# Altium PCB PCB1.PcbDoc (part 1 of 4)
Units mm, origin at the board's own origin, x right, y up, seen from the top; angles counter-clockwise.
Board outline 134.12 x 116.9 mm, 4 copper layers (Top Layer, Layer 1, Layer 2, Bottom Layer), stack 1.312 mm thick; 317 components, 155 nets, 807 pads, 898 vias.
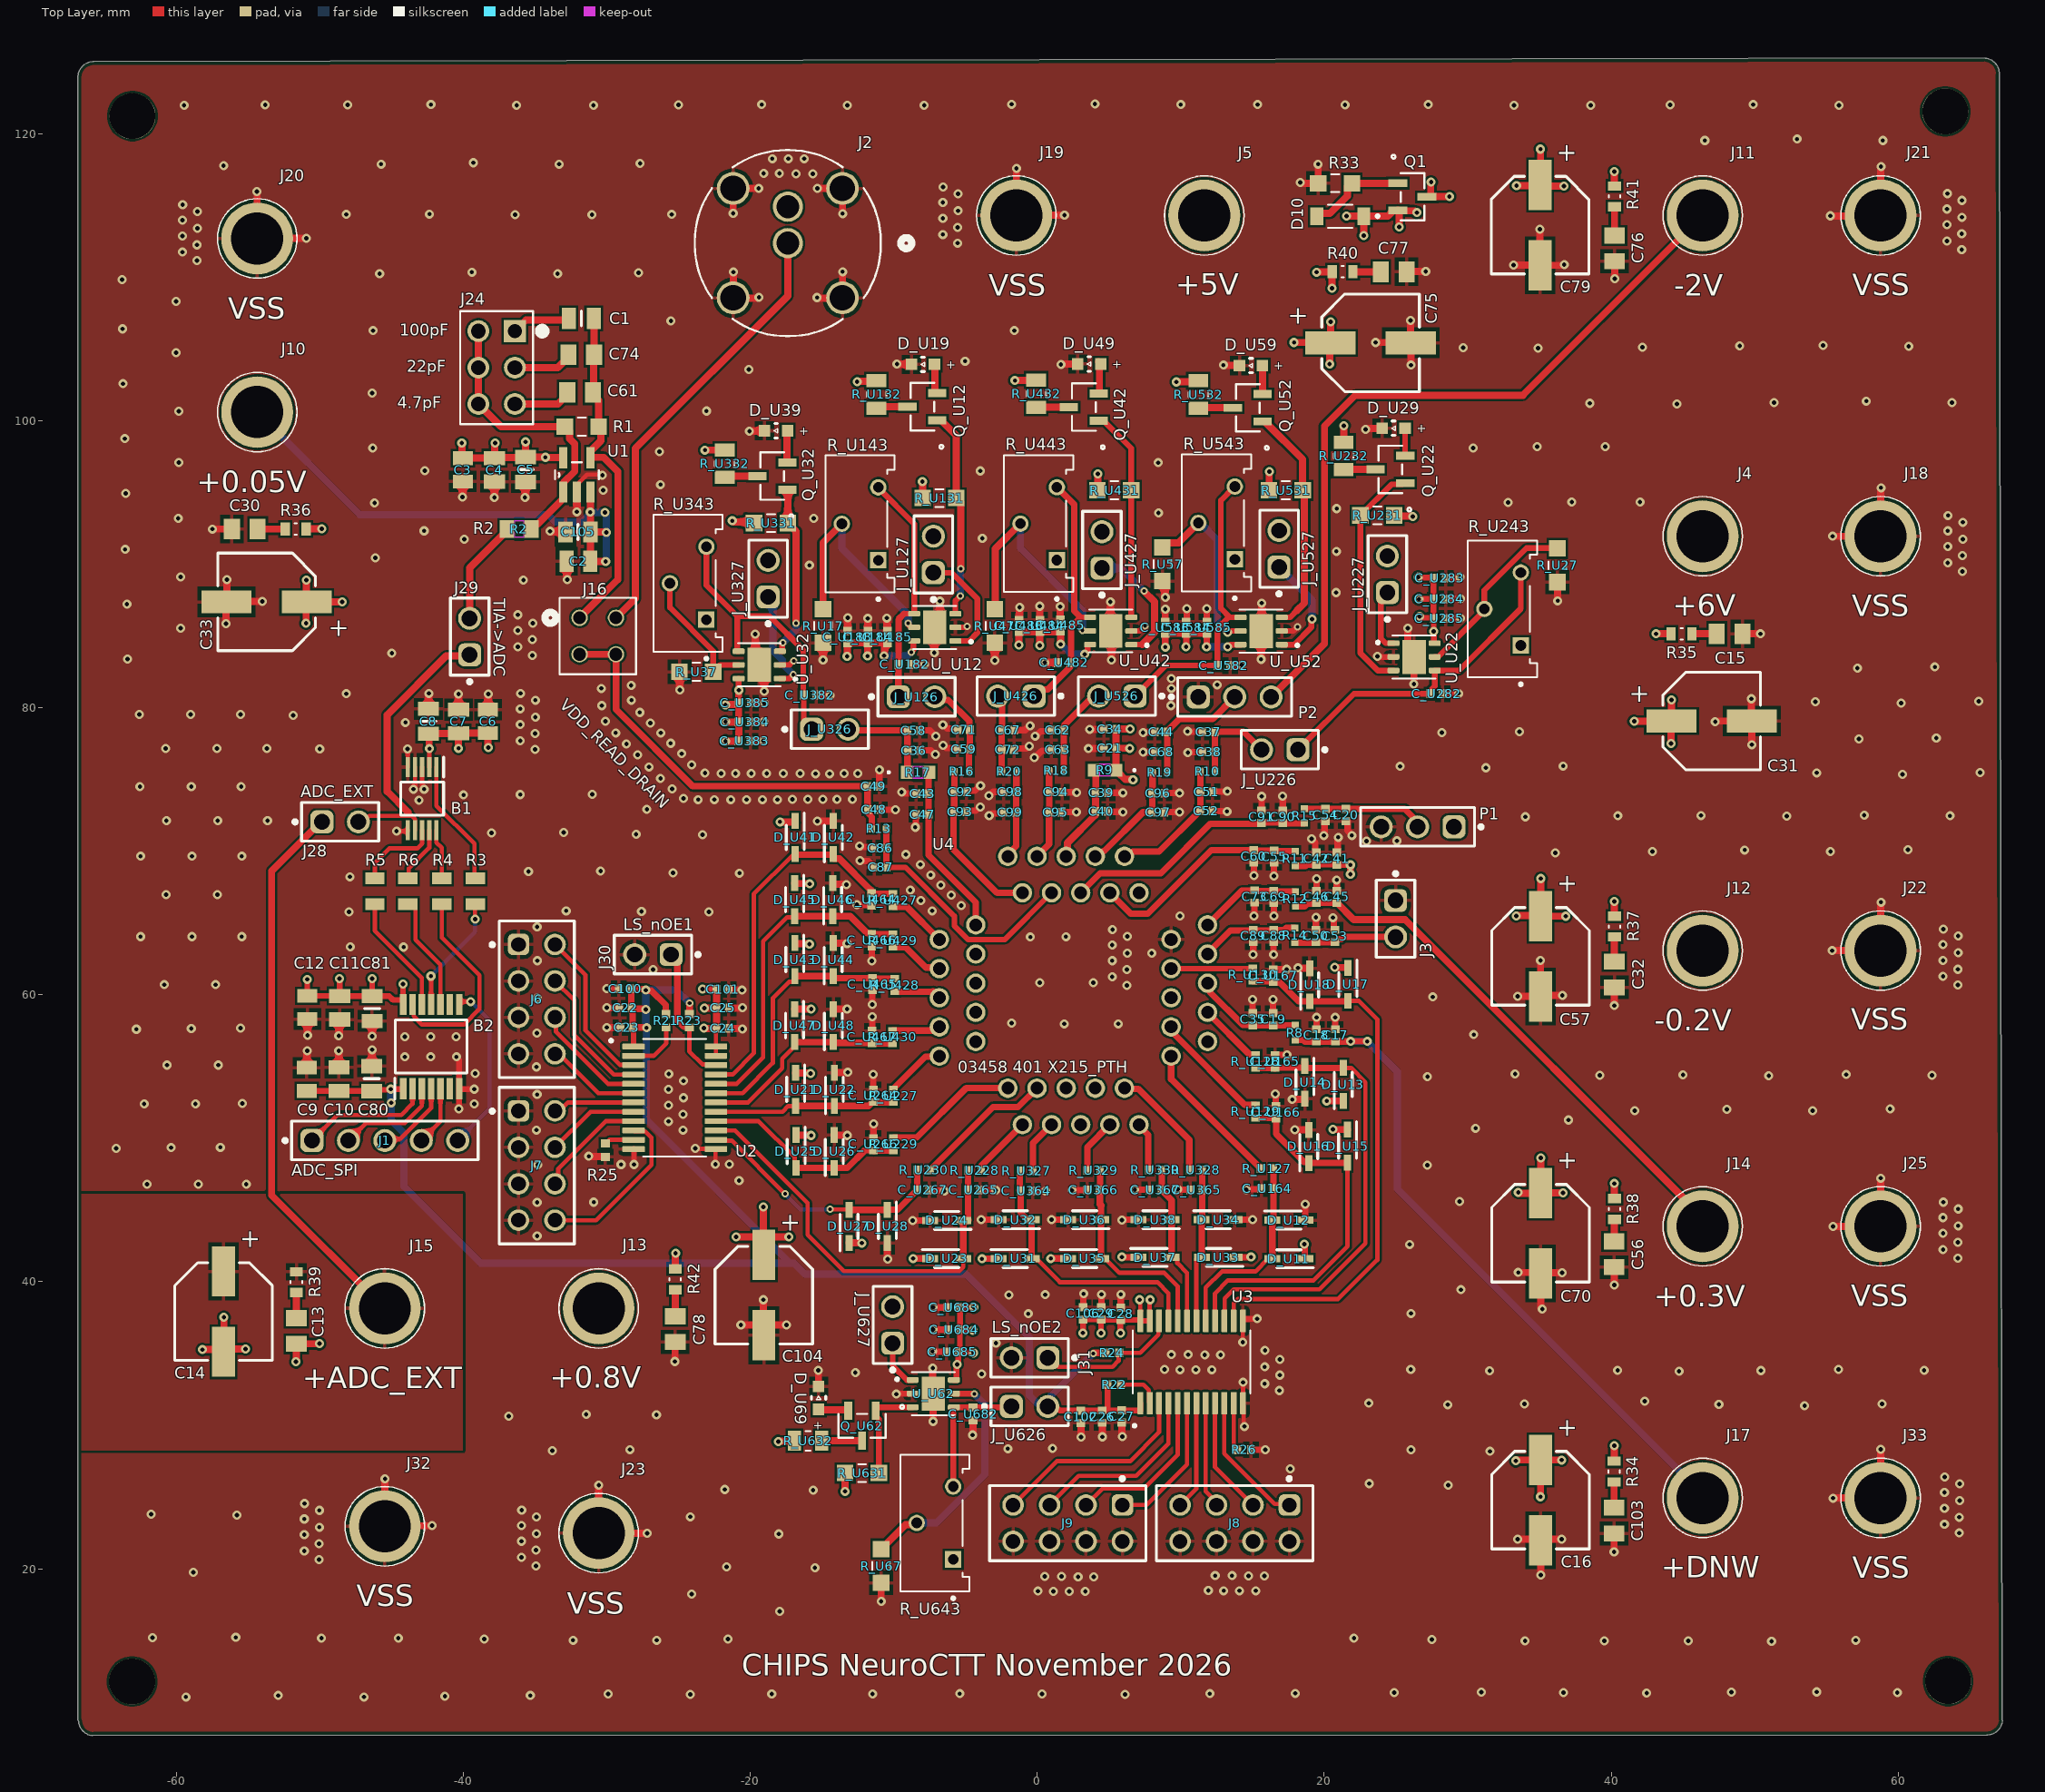
[diagram p0: Top Layer view]
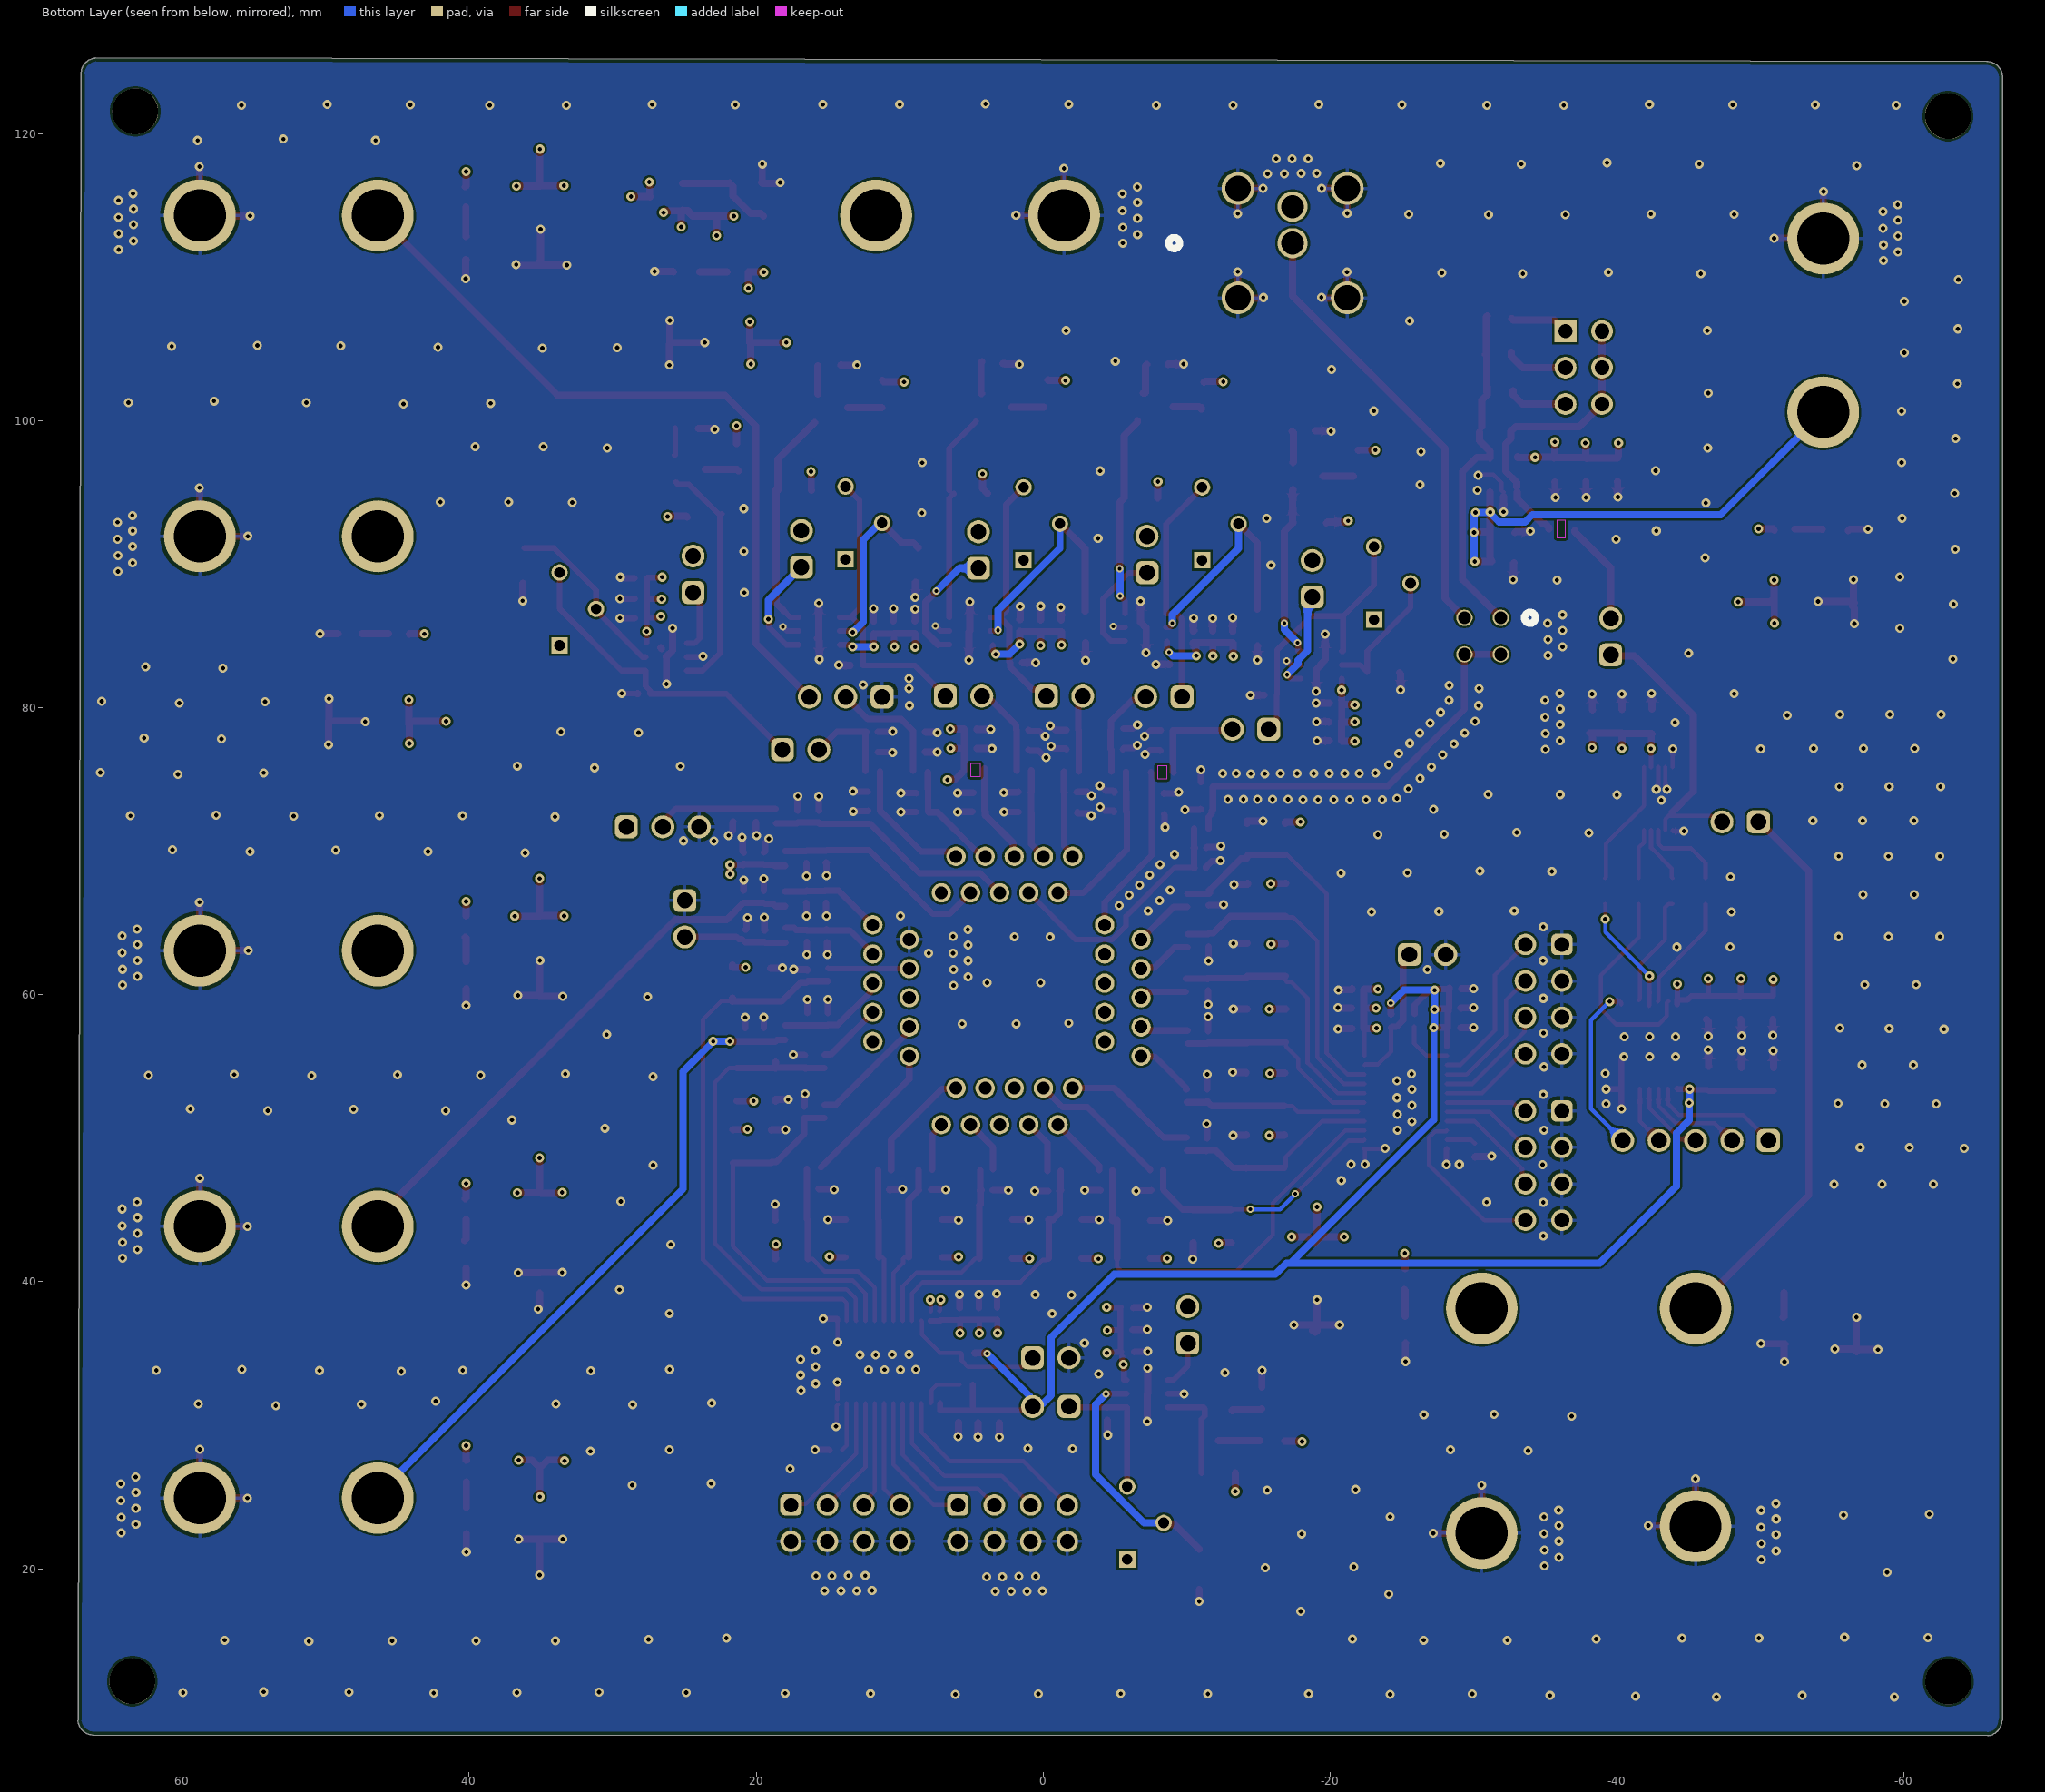
[diagram p1: Bottom Layer view, seen from below]
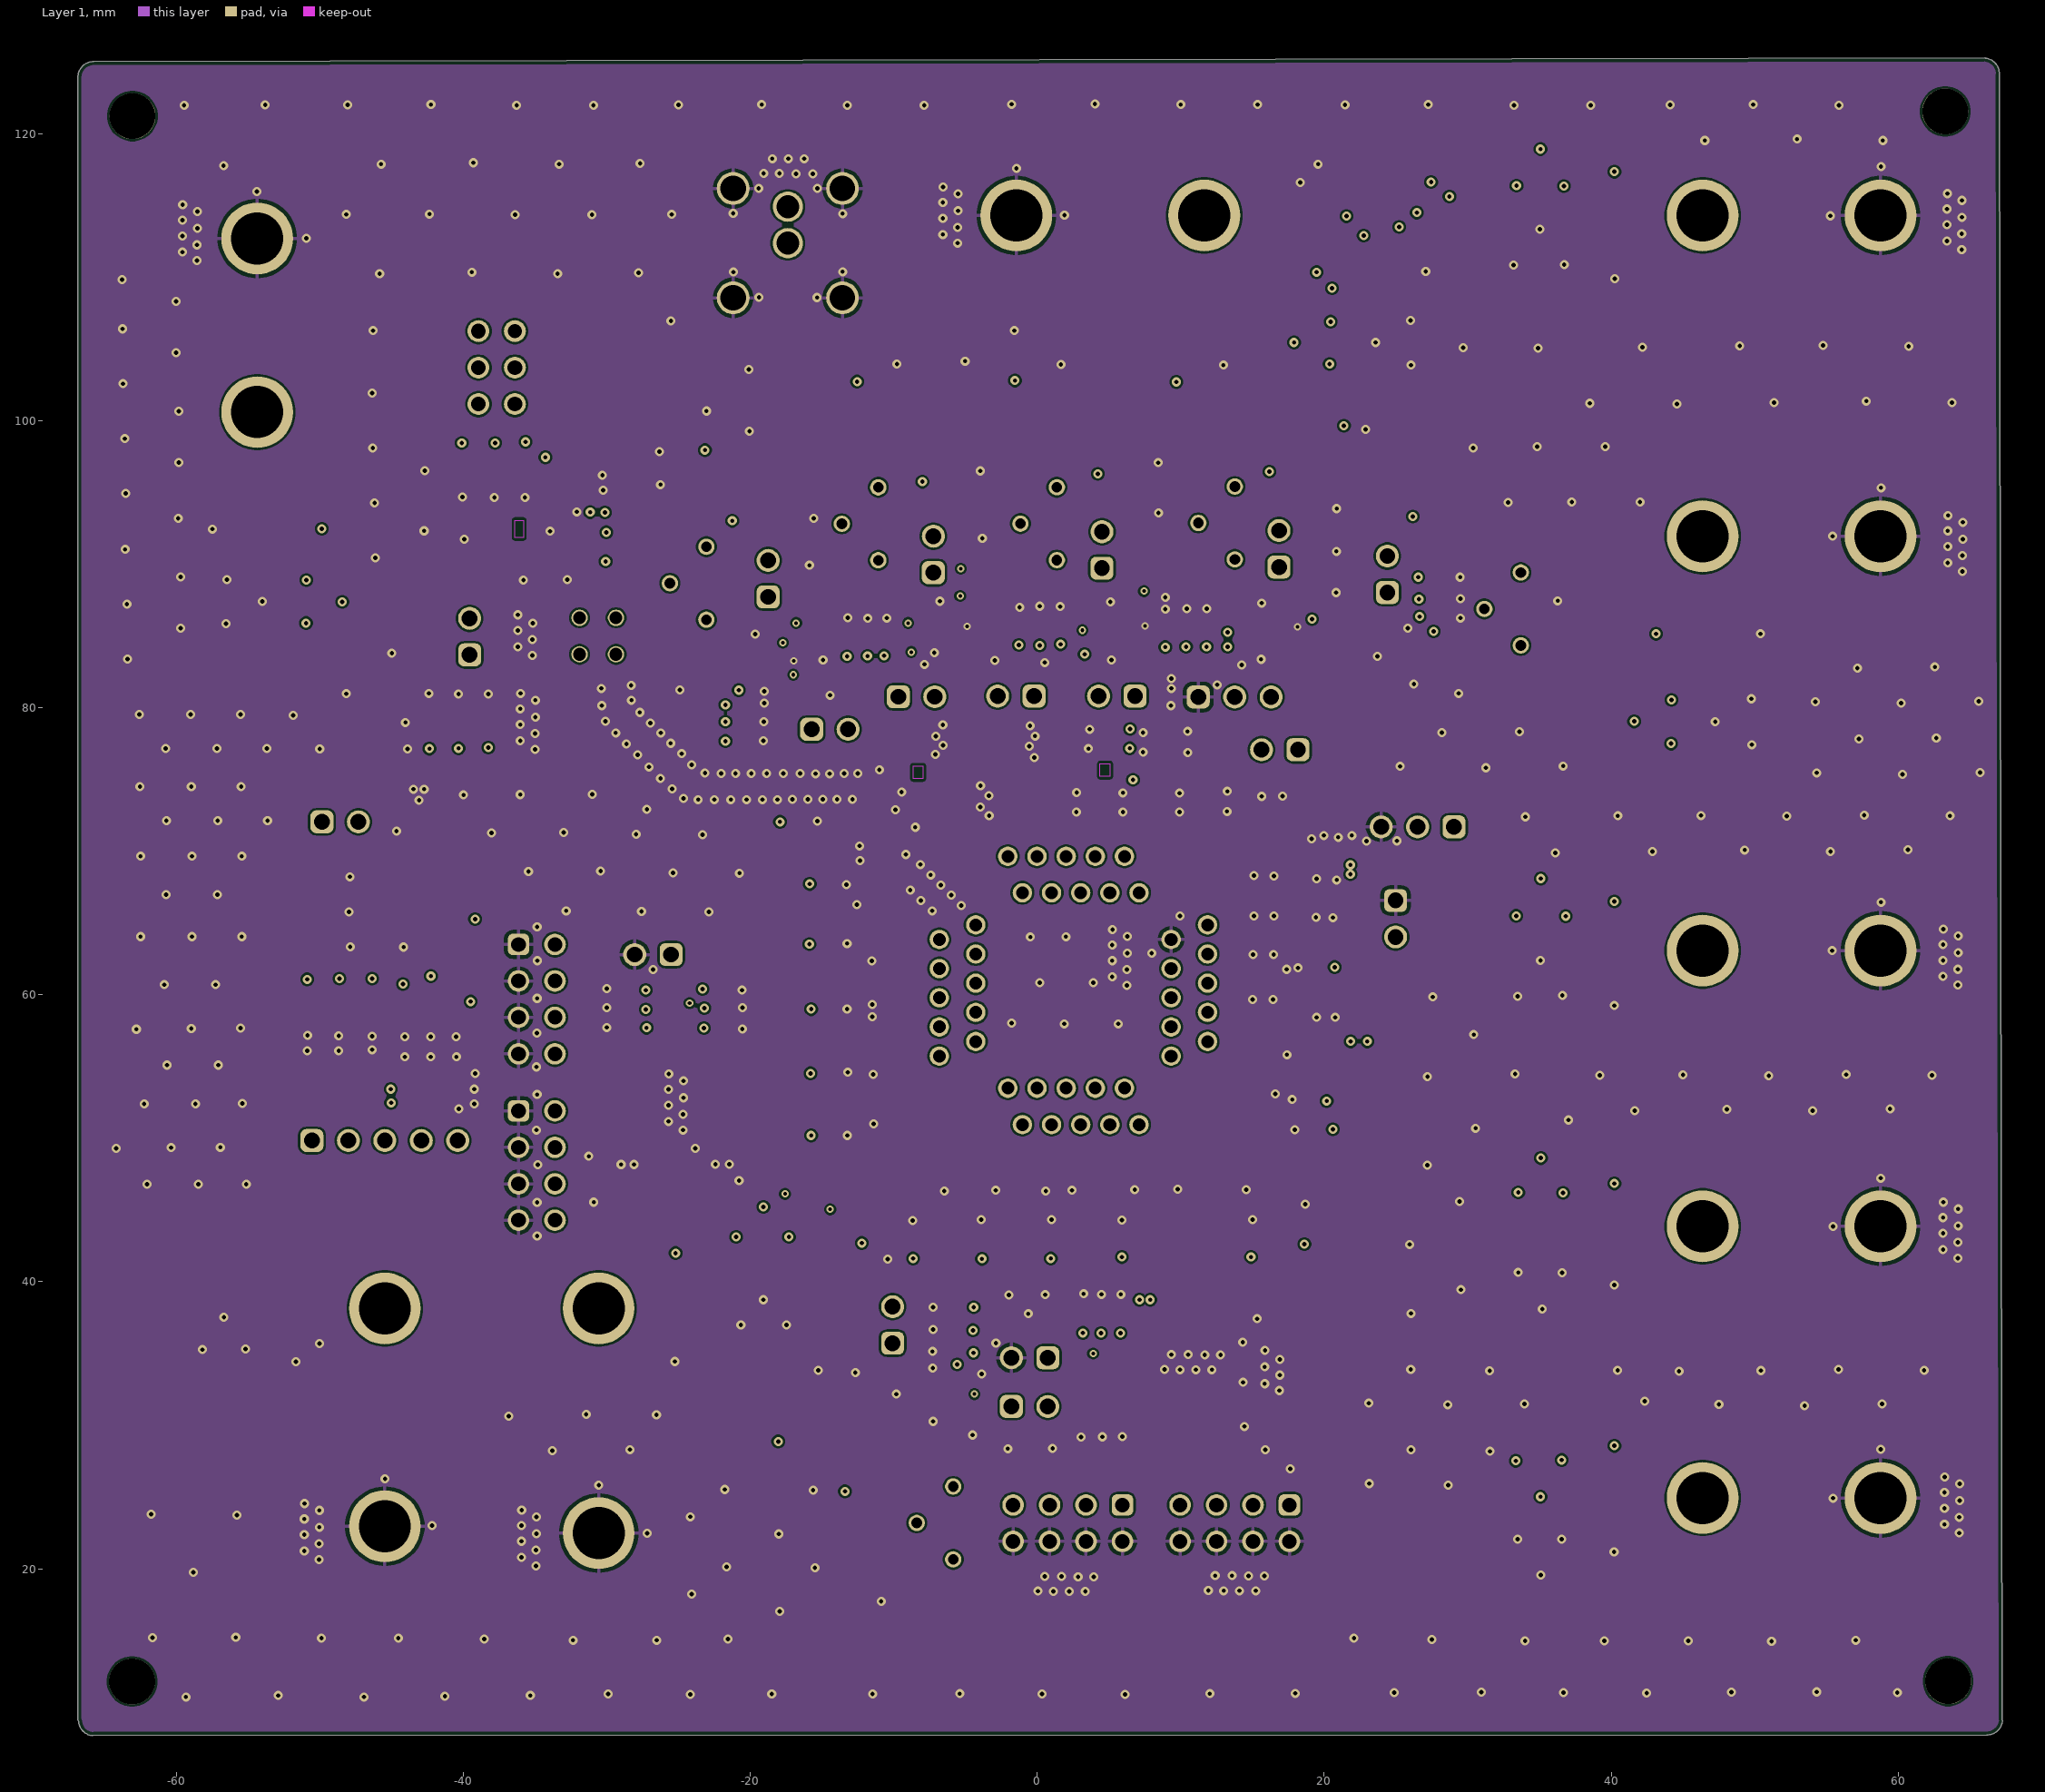
[diagram p2: Layer 1]
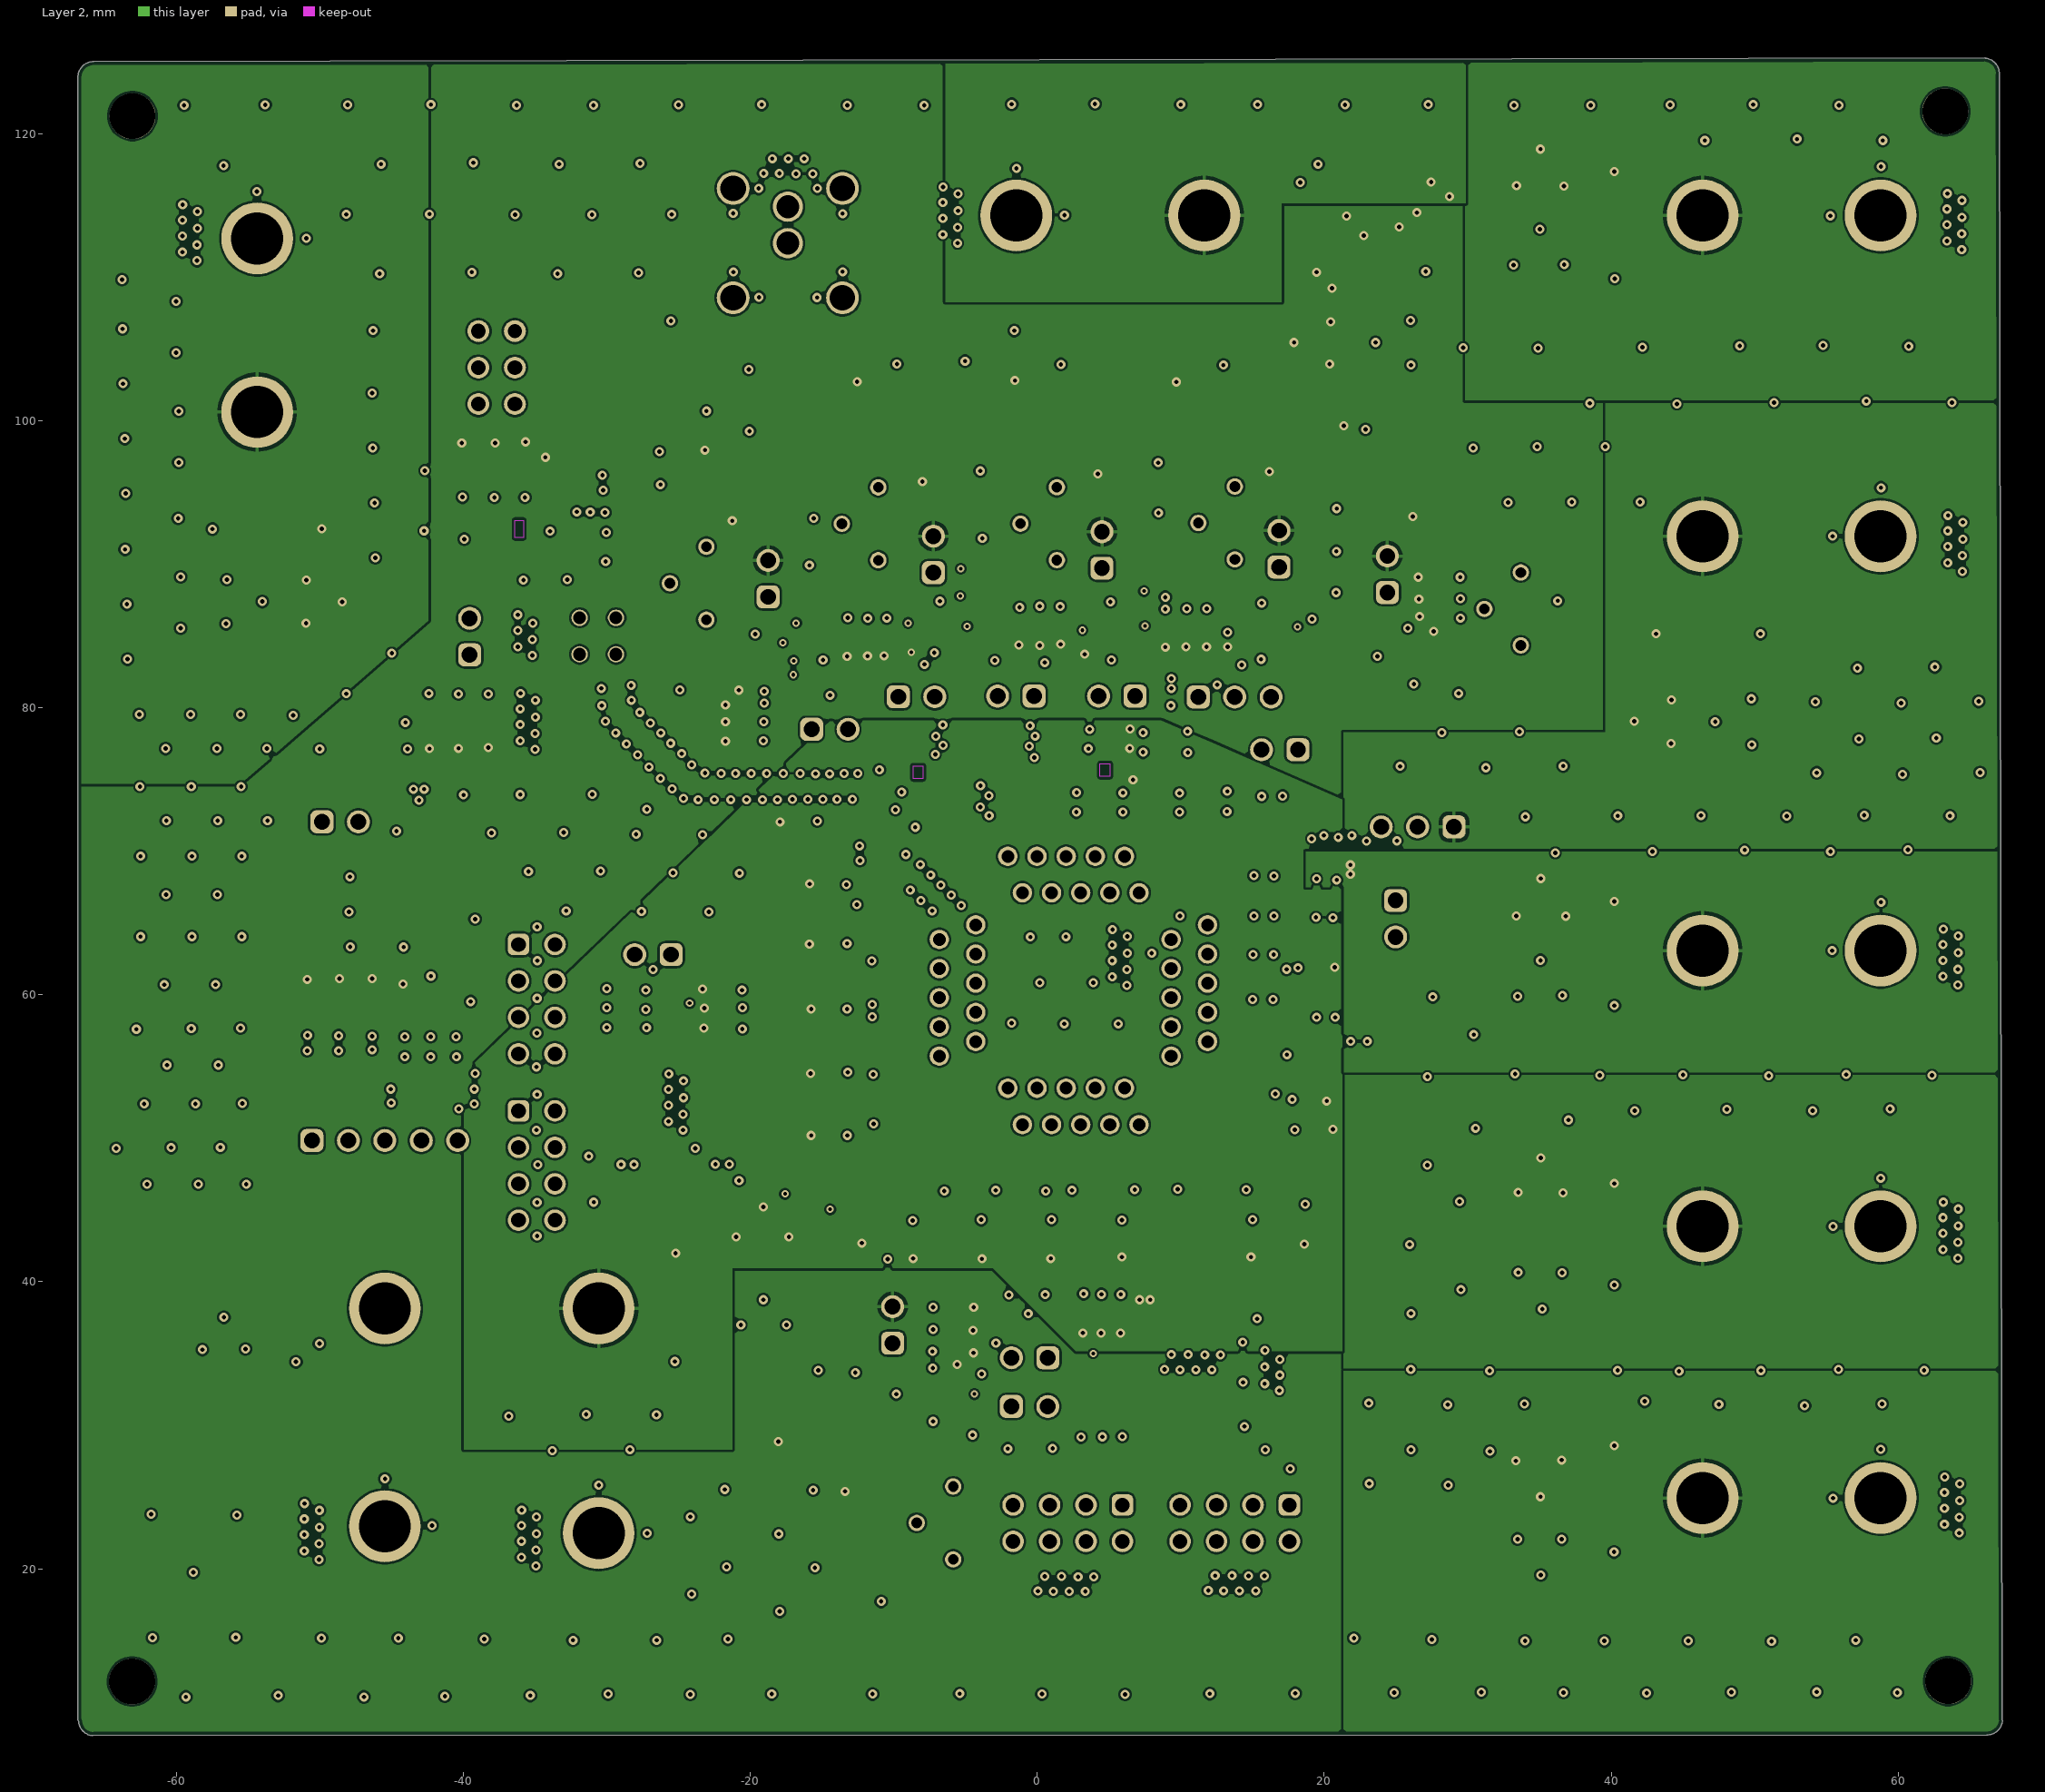
[diagram p3: Layer 2]

## Layer stack, top to bottom
Top Solder: solder mask 0.0175, Solder Resist, Dk 3.3
Top Layer: signal copper 0.035
Dielectric 1: prepreg 0.0711, PP-006, Dk 4.74
Layer 1: signal copper 0.035
Dielectric1: core 1.03, FR-4, Dk 4.6
Layer 2: signal copper 0.035
Dielectric 2: prepreg 0.0711, PP-006, Dk 4.74
Bottom Layer: signal copper 0.035
Bottom Solder: solder mask 0.0175, Solder Resist, Dk 3.3

## Board outline
-65.804,8.375 cw(c-65.725,9.461) -66.813,9.426 -66.85,9.475 -66.85,124 -66.841,124.029 cw(c-65.756,123.936) -65.75,125.025 -65.74,125.024 66.05,125.275 66.083,125.263 cw(c65.961,124.181) 67.05,124.181 67.039,124.143 67.254,9.472 67.267,9.435 cw(c66.181,9.514) 66.175,8.425 66.162,8.426

## Design rules (kind name [scope] priority, off if disabled: settings)
BoardOutlineClearance [All] p1: gap=0.254 ignorepadtopadclearanceinfootprint=FALSE except(0: Arc-SplitContinuation Track-SplitContinuation SMDPad-SplitContinuation THPad-SplitContinuation Via-SplitContinuation Fill-SplitContinuation Poly-SplitContinuation Region-SplitContinuation Text-SplitContinuation)
Clearance "Dense area exception" [(IsComponent AND IsComponentBody) vs (IsComponent AND IsComponentBody)] p1: gap=0 ignorepadtopadclearanceinfootprint=FALSE
Clearance Clearance_1 [All] p2: gap=0.15 ignorepadtopadclearanceinfootprint=TRUE except(0: Arc-Text Track-Text SMDPad-Text THPad-Text Via-Via Via-Text Fill-Text Poly-Text Region-Text Text-Text Text-Hole; 0.2: Fill-Fill Fill-Poly Fill-Region Poly-Poly Poly-Region Region-Region)
DiffPairsRouting [All] p1: maxlimit=0.254 minlimit=0.254 mostfreqgap=0.254 toplayer_minwidth=0.254 toplayer_maxwidth=0.254 toplayer_prefwidth=0.254 midlayer1_minwidth=0.254 midlayer1_maxwidth=0.254 midlayer1_prefwidth=0.254 midlayer2_minwidth=0.254 midlayer2_maxwidth=0.254 midlayer2_prefwidth=0.254 bottomlayer_minwidth=0.254 bottomlayer_maxwidth=0.254 bottomlayer_prefwidth=0.254 maxuncoupledlength=12.7
HoleSize [All] p1: absolutevalues=TRUE maxlimit=7.62 minlimit=0.254 maxpercent=80.000 minpercent=20.000
MinimumAnnularRing [All] p1: minimumring=0.254
PasteMaskExpansion [All] p1: expansion=0.2
PlaneClearance [All] p1: clearance=0.381
PlaneConnect [All] p1: pad.planeconnectstyle=Relief pad.reliefexpansion=0.508 pad.reliefentries=4 pad.reliefconductorwidth=0.254 pad.reliefairgap=0.254 via.planeconnectstyle=Direct via.reliefexpansion=0.508 via.reliefentries=4 via.reliefconductorwidth=0.254 via.reliefairgap=0.254
PolygonConnect [All] p1: thpad.connectstyle=Relief thpad.reliefconductorwidth=0.254 thpad.reliefentries=4 thpad.polygonreliefangle="90 Angle" thpad.airgapwidth=0.254 smdpad.connectstyle=Relief smdpad.reliefconductorwidth=0.254 smdpad.reliefentries=4 smdpad.polygonreliefangle="90 Angle" smdpad.airgapwidth=0.254 via.connectstyle=Direct via.reliefconductorwidth=0.254 via.reliefentries=4 via.polygonreliefangle="90 Angle" via.airgapwidth=0.254
RoutingVias [All] p1: holewidth=0.305 width=0.635 viastyle="Through Hole" minholewidth=0.254 minwidth=0.508 maxholewidth=0.305 maxwidth=0.635
SMDNeckDown [All] p1: percent=100.000
SilkToSolderMaskClearance SilkscreenOverComponentPads [IsPad] p1: minsilkscreentomaskgap=0.254 clearancetoexposedcopper=TRUE
SolderMaskExpansion [All] p1: expansion=0.05 istentingtop=FALSE
SupplyNets "Schematic Supply Nets_8" [InNet('+6V')] p1: voltage=0.000
SupplyNets "Schematic Supply Nets_2" [InNet('VDD_5V_U1')] p2: voltage=0.000
SupplyNets "Schematic Supply Nets_7" [InNet('+0.3V')] p3: voltage=0.000
SupplyNets "Schematic Supply Nets_5" [InNet('-2V')] p4: voltage=0.000
SupplyNets "Schematic Supply Nets_4" [InNet('+0.8V')] p5: voltage=0.000
SupplyNets "Schematic Supply Nets_3" [InNet('-0.2V')] p6: voltage=0.000
SupplyNets "Schematic Supply Nets_1" [InNet('CHIPS_VSS')] p7: voltage=0.000
SupplyNets "Schematic Supply Nets" [InNet('+0.05V')] p8: voltage=0.000
Width [All] p1: maxlimit=0.5 minlimit=0.102 preferedwidth=0.3 midlayer1_minwidth=0.254 midlayer1_prefwidth=0.254 midlayer2_minwidth=0.254 midlayer2_prefwidth=0.254 minimp=50.000000 maximp=50.000000 favimp=50.000000
24 further rules are at their usual default settings.

## Classes and differential pairs
component class U_LDO5: C_U582 C_U583 C_U584 C_U585 D_U59 J_U526 J_U527 Q_U52 R_U57 R_U531 R_U532 R_U543 U_U52
component class U_LDO1: C_U182 C_U183 C_U184 C_U185 D_U19 J_U126 J_U127 Q_U12 R_U17 R_U131 R_U132 R_U143 U_U12
component class U_LDO6: C_U682 C_U683 C_U684 C_U685 D_U69 J_U626 J_U627 Q_U62 R_U67 R_U631 R_U632 R_U643 U_U62
channel class LDO: U_LDO1 U_LDO2 U_LDO3 U_LDO4 U_LDO5 U_LDO6
channel class ESD-0.8V: U_ESD-0.8V1 U_ESD-0.8V2 U_ESD-0.8V3 U_ESD-0.8V4
component class U_TIA: C1 C2 C3 C4 C5 C61 C74 C105 J24 R1 R2 U4
component class U_LDO4: C_U482 C_U483 C_U484 C_U485 D_U49 J_U426 J_U427 Q_U42 R7_U_LDO4 R_U47 R_U431 R_U432 R_U443 U_U42 U_U_LDO4
component class U_LDO3: C_U382 C_U383 C_U384 C_U385 D_U39 J_U326 J_U327 Q_U32 R7_U_LDO3 R_U37 R_U331 R_U332 R_U343 U_U32 U_U_LDO3
component class U_LDO2: C_U282 C_U283 C_U284 C_U285 D_U29 J_U226 J_U227 Q_U22 R7_U_LDO2 R_U27 R_U231 R_U232 R_U243 U_U22 U_U_LDO2
component class U_ESD-0.8V4: C_U464 C_U465 C_U466 C_U467 D_U41 D_U42 D_U43 D_U44 D_U45 D_U46 D_U47 D_U48 R_U427 R_U428 R_U429 R_U430
component class U_ESD-0.8V3: C_U364 C_U365 C_U366 C_U367 D_U31 D_U32 D_U33 D_U34 D_U35 D_U36 D_U37 D_U38 R_U327 R_U328 R_U329 R_U330
component class U_ESD-0.8V2: C_U264 C_U265 C_U266 C_U267 D_U21 D_U22 D_U23 D_U24 D_U25 D_U26 D_U27 D_U28 R_U227 R_U228 R_U229 R_U230
component class U_ESD-0.8V1: C_U164 C_U165 C_U166 C_U167 D_U11 D_U12 D_U13 D_U14 D_U15 D_U16 D_U17 D_U18 R_U127 R_U128 R_U129 R_U130
component class U_Connectors: C13 C14 C15 C16 C30 C31 C32 C33 C56 C57 C70 C75 C76 C77 C78 C79 C103 C104 D10 J1 J2 J3 J4 J5 J6 J7 J8 J9 J10 J11 J12 J13 J14 J15 J16 J17 J18 J19 J20 J21 J22 J23 J25 J28 J29 J30 J31 J32 J33 P1 P2 Q1 R33 R34 R35 R36 R37 R38 R39 R40 R41 R42
component class U_Chip: * C17 C18 C19 C20 C21 C22 C23 C24 C25 C26 C27 C28 C29 C34 C35 C36 C37 C38 C39 C40 C41 C42 C43 C44 C45 C46 C47 C48 C49 C50 C51 C52 C53 C54 C55 C58 C59 C60 C62 C63 C67 C68 C69 C71 C72 C73 C86 C87 C88 C89 C90 C91 C92 C93 C94 C95 C96 C97 C98 C99 C100 C101 C102 C106 R8 R9 R10 R11 R12 R13 R14 R15 R16 R17 R18 R19 R20 R21 R22 R23 R24 R25 R26 U2 U3 U4
component class U_ADC: B1 B2 C6 C7 C8 C9 C10 C11 C12 C80 C81 R3 R4 R5 R6

## Components (designator, comment, footprint, x,y, rotation, side; value= is the part's Value field where it differs from the comment)
B1 "ADC124S101CIMM_NOPB" SOP50P490X110-10N -42.863,73.665 r270 top
B2 "TXU0304QPWRQ1" SOP65P640X120-14N -42.233,56.388 r90 top
C1 "0805CA101KAT2A" CAPC2112X94N -31.775,107.125 r180 top
C2 "VJ0805Y104KXAMR" CAPC2012X145N -31.975,90.2 r0 top
C3 "VJ0805Y105KXQTW1BC" CAPC2012X135N -40.025,96.575 r90 top
C4 "VJ0805Y104KXAMR" CAPC2012X145N -37.825,96.575 r90 top
C5 "0805CA101KAT2A" CAPC2112X94N -35.65,96.6 r90 top
C6 "VJ0805Y105KXQTW1BC" CAPC2012X135N -38.275,79.05 r270 top
C7 "VJ0805Y104KXAMR" CAPC2012X145N -40.325,79.05 r270 top
C8 "0805CA101KAT2A" CAPC2112X94N -42.425,79.05 r270 top
C9 "VJ0805Y105KXQTW1BC" CAPC2012X135N -50.906,54.109 r270 top
C10 "VJ0805Y104KXAMR" CAPC2012X145N -48.656,54.117 r270 top
C11 "VJ0805Y104KXAMR" CAPC2012X145N -48.607,59.097 r90 top
C12 "VJ0805Y105KXQTW1BC" CAPC2012X135N -50.857,59.116 r90 top
C13 "CC0805KRX5R7BB106" CAP_CC0805_YAG -51.625,36.575 r90 top
C14 "865080343009" WCAP-ASLI_6.3X5.5(DXL) -56.7,37.925 r90 top
C15 "CC0805KRX5R7BB106" CAP_CC0805_YAG 48.25,85.15 r180 top
C16 "865080343009" WCAP-ASLI_6.3X5.5(DXL) 35.075,24.785 r90 top
C17 "GMT04X7S105K10NT10" CAPC1005X55N 20.775,57.175 r270 top
C18 "GMT04X7S105K10NT10" CAPC1005X55N 19.46,57.175 r270 top
C19 "VJ0402Y104KXXCW1BC" CAPC1005X55N 16.435,58.298 r270 top
C20 "GMT04X7S105K10NT10" CAPC1005X55N 21.517,72.525 r90 top
C21 "GMT04X7S105K10NT10" CAPC1005X55N 5.073,77.175 r0 top
C22 "VJ0402Y104KXXCW1BC" CAPC1005X55N -28.7,59.075 r0 top
C23 "C0402C101J1GACAUTO" CAPC1005X55N -28.625,57.725 r0 top
C24 "C0402C101J1GACAUTO" CAPC1005X55N -21.925,57.65 r180 top
C25 "VJ0402Y104KXXCW1BC" CAPC1005X55N -21.925,59.075 r180 top
C26 "VJ0402Y104KXXCW1BC" CAPC1005X55N 4.525,30.6 r90 top
C27 "C0402C101J1GACAUTO" CAPC1005X55N 5.9,30.625 r90 top
C28 "C0402C101J1GACAUTO" CAPC1005X55N 5.825,37.77 r270 top
C29 "VJ0402Y104KXXCW1BC" CAPC1005X55N 4.45,37.8 r270 top
C30 "CC0805KRX5R7BB106" CAP_CC0805_YAG -55.225,92.45 r0 top
C31 "865080343009" WCAP-ASLI_6.3X5.5(DXL) 47,79.075 r180 top
C32 "CC0805KRX5R7BB106" CAP_CC0805_YAG 40.225,61.415 r90 top
C33 "865080343009" WCAP-ASLI_6.3X5.5(DXL) -53.703,87.375 r0 top
C34 "GMT04X7S105K10NT10" CAPC1005X55N 5.075,78.5 r0 top
C35 "VJ0402Y104KXXCW1BC" CAPC1005X55N 15.02,58.298 r270 top
C36 "GMT04X7S105K10NT10" CAPC1005X55N -8.6,77.025 r180 top
C37 "GMT04X7S105K10NT10" CAPC1005X55N 11.936,78.311 r0 top
C38 "GMT04X7S105K10NT10" CAPC1005X55N 11.947,76.922 r0 top
C39 "VJ0402Y104KXXCW1BC" CAPC1005X55N 4.475,74.075 r180 top
C40 "VJ0402Y104KXXCW1BC" CAPC1005X55N 4.475,72.775 r180 top
C41 "GMT04X7S105K10NT10" CAPC1005X55N 20.875,69.495 r270 top
C42 "GMT04X7S105K10NT10" CAPC1005X55N 19.46,69.495 r270 top
C43 "VJ0402Y104KXXCW1BC" CAPC1005X55N -8,74.025 r0 top
C44 "GMT04X7S105K10NT10" CAPC1005X55N 8.625,78.308 r0 top
C45 "GMT04X7S105K10NT10" CAPC1005X55N 20.875,66.821 r270 top
C46 "GMT04X7S105K10NT10" CAPC1005X55N 19.46,66.821 r270 top
C47 "VJ0402Y104KXXCW1BC" CAPC1005X55N -8.005,72.575 r0 top
C48 "GMT04X7S105K10NT10" CAPC1005X55N -11.375,72.9 r180 top
C49 "GMT04X7S105K10NT10" CAPC1005X55N -11.423,74.525 r180 top
C50 "GMT04X7S105K10NT10" CAPC1005X55N 19.42,64.1 r270 top
C51 "VJ0402Y104KXXCW1BC" CAPC1005X55N 11.795,74.15 r180 top
C52 "VJ0402Y104KXXCW1BC" CAPC1005X55N 11.775,72.8 r180 top
C53 "GMT04X7S105K10NT10" CAPC1005X55N 20.75,64.098 r270 top
C54 "GMT04X7S105K10NT10" CAPC1005X55N 20.1,72.523 r90 top
C55 "VJ0402Y104KXXCW1BC" CAPC1005X55N 16.5,69.625 r90 top
C56 "CC0805KRX5R7BB106" CAP_CC0805_YAG 40.2,41.915 r90 top
C57 "865080343009" WCAP-ASLI_6.3X5.5(DXL) 35.075,62.68 r90 top
C58 "GMT04X7S105K10NT10" CAPC1005X55N -8.616,78.423 r180 top
C59 "GMT04X7S105K10NT10" CAPC1005X55N -5.127,77.125 r0 top
C60 "VJ0402Y104KXXCW1BC" CAPC1005X55N 15.1,69.65 r90 top
C61 "CC0805CRNPO0BN4R7" CAP_CC0805_YAG -31.85,101.975 r180 top
C62 "GMT04X7S105K10NT10" CAPC1005X55N 1.422,78.438 r0 top
C63 "GMT04X7S105K10NT10" CAPC1005X55N 1.422,77.073 r0 top
C67 "GMT04X7S105K10NT10" CAPC1005X55N -2.047,78.438 r180 top
C68 "GMT04X7S105K10NT10" CAPC1005X55N 8.625,76.925 r0 top
C69 "VJ0402Y104KXXCW1BC" CAPC1005X55N 16.475,66.825 r90 top
C70 "865080343009" WCAP-ASLI_6.3X5.5(DXL) 35.075,43.386 r90 top
C71 "GMT04X7S105K10NT10" CAPC1005X55N -5.121,78.48 r0 top
C72 "GMT04X7S105K10NT10" CAPC1005X55N -2.05,77.075 r180 top
C73 "VJ0402Y104KXXCW1BC" CAPC1005X55N 15.15,66.85 r90 top
C74 "CC0805JRNPOABN220" CAP_CC0805_YAG -31.775,104.6 r180 top
C75 "865080343009" WCAP-ASLI_6.3X5.5(DXL) 23.231,105.425 r180 top
C76 "CC0805KRX5R7BB106" CAP_CC0805_YAG 40.229,112.004 r90 top
C77 "CC0805KRX5R7BB106" CAP_CC0805_YAG 24.84,110.38 r180 top
C78 "CC0805KRX5R7BB106" CAP_CC0805_YAG -25.225,36.7 r90 top
C79 "865080343009" WCAP-ASLI_6.3X5.5(DXL) 35.041,113.625 r90 top
C80 "0805CA101KAT2A" CAPC2112X94N -46.371,54.156 r270 top
C81 "0805CA101KAT2A" CAPC2112X94N -46.353,59.045 r90 top
C86 "VJ0402Y104KXXCW1BC" CAPC1005X55N -10.948,70.225 r0 top
C87 "VJ0402Y104KXXCW1BC" CAPC1005X55N -10.92,68.875 r0 top
C88 "VJ0402Y104KXXCW1BC" CAPC1005X55N 16.475,64.105 r90 top
C89 "VJ0402Y104KXXCW1BC" CAPC1005X55N 15.05,64.1 r90 top
C90 "VJ0402Y104KXXCW1BC" CAPC1005X55N 17.125,72.4 r270 top
C91 "VJ0402Y104KXXCW1BC" CAPC1005X55N 15.625,72.4 r270 top
C92 "VJ0402Y104KXXCW1BC" CAPC1005X55N -5.355,74.15 r180 top
C93 "VJ0402Y104KXXCW1BC" CAPC1005X55N -5.38,72.75 r180 top
C94 "VJ0402Y104KXXCW1BC" CAPC1005X55N 1.3,74.125 r180 top
C95 "VJ0402Y104KXXCW1BC" CAPC1005X55N 1.27,72.725 r180 top
C96 "VJ0402Y104KXXCW1BC" CAPC1005X55N 8.425,74.05 r180 top
C97 "VJ0402Y104KXXCW1BC" CAPC1005X55N 8.42,72.725 r180 top
C98 "VJ0402Y104KXXCW1BC" CAPC1005X55N -1.905,74.125 r0 top
C99 "VJ0402Y104KXXCW1BC" CAPC1005X55N -1.905,72.725 r0 top
C100 "GMT04X7S105K10NT10" CAPC1005X55N -28.73,60.425 r0 top
C101 "GMT04X7S105K10NT10" CAPC1005X55N -21.93,60.375 r180 top
C102 "GMT04X7S105K10NT10" CAPC1005X55N 3.05,30.595 r90 top
C103 "CC0805KRX5R7BB106" CAP_CC0805_YAG 40.2,23.36 r90 top
C104 "865080343009" WCAP-ASLI_6.3X5.5(DXL) -19.05,39.075 r90 top
C105 "0805CA101KAT2A" CAPC2112X94N -32,92.25 r0 top
C106 "GMT04X7S105K10NT10" CAPC1005X55N 3.2,37.805 r270 top
C_U164 "C0402C101J1GACAUTO" CAPC1005X55N 16.038,46.484 r0 top (schematic designator C64)
C_U165 "C0402C101J1GACAUTO" CAPC1005X55N 16.575,55.352 r270 top (schematic designator C65)
C_U166 "C0402C101J1GACAUTO" CAPC1005X55N 16.652,51.811 r270 top (schematic designator C66)
C_U167 "C0402C101J1GACAUTO" CAPC1005X55N 16.435,61.335 r270 top (schematic designator C67)
C_U182 "GRT155R60J475ME13J" CAPC1005X60N -9.235,83.021 r180 top (schematic designator C82)
C_U183 "GMT04X7S105K10NT10" CAPC1005X55N -13.215,84.92 r270 top (schematic designator C83)
C_U184 "VJ0402Y104KXXCW1BC" CAPC1005X55N -11.802,84.929 r270 top (schematic designator C84)
C_U185 "C0402C101J1GACAUTO" CAPC1005X55N -10.448,84.924 r270 top (schematic designator C85)
C_U264 "C0402C101J1GACAUTO" CAPC1005X55N -11.425,52.975 r270 top (schematic designator C64)
C_U265 "C0402C101J1GACAUTO" CAPC1005X55N -4.414,46.395 r180 top (schematic designator C65)
C_U266 "C0402C101J1GACAUTO" CAPC1005X55N -11.425,49.591 r270 top (schematic designator C66)
C_U267 "C0402C101J1GACAUTO" CAPC1005X55N -7.959,46.411 r180 top (schematic designator C67)
C_U282 "GRT155R60J475ME13J" CAPC1005X60N 27.825,80.975 r180 top (schematic designator C82)
C_U283 "GMT04X7S105K10NT10" CAPC1005X55N 28.047,89.024 r180 top (schematic designator C83)
C_U284 "VJ0402Y104KXXCW1BC" CAPC1005X55N 28.035,87.594 r180 top (schematic designator C84)
C_U285 "C0402C101J1GACAUTO" CAPC1005X55N 28.035,86.229 r180 top (schematic designator C85)
C_U364 "C0402C101J1GACAUTO" CAPC1005X55N -0.746,46.334 r180 top (schematic designator C64)
C_U365 "C0402C101J1GACAUTO" CAPC1005X55N 11.102,46.411 r0 top (schematic designator C65)
C_U366 "C0402C101J1GACAUTO" CAPC1005X55N 3.921,46.395 r0 top (schematic designator C66)
C_U367 "C0402C101J1GACAUTO" CAPC1005X55N 8.241,46.411 r0 top (schematic designator C67)
C_U382 "GRT155R60J475ME13J" CAPC1005X60N -15.833,80.883 r180 top (schematic designator C82)
C_U383 "GMT04X7S105K10NT10" CAPC1005X55N -20.4,77.675 r180 top (schematic designator C83)
C_U384 "VJ0402Y104KXXCW1BC" CAPC1005X55N -20.375,79.025 r180 top (schematic designator C84)
C_U385 "C0402C101J1GACAUTO" CAPC1005X55N -20.375,80.325 r180 top (schematic designator C85)
C_U464 "C0402C101J1GACAUTO" CAPC1005X55N -11.536,66.643 r90 top (schematic designator C64)
C_U465 "C0402C101J1GACAUTO" CAPC1005X55N -11.464,60.738 r90 top (schematic designator C65)
C_U466 "C0402C101J1GACAUTO" CAPC1005X55N -11.525,63.8 r90 top (schematic designator C66)
C_U467 "C0402C101J1GACAUTO" CAPC1005X55N -11.5,57.056 r270 top (schematic designator C67)
C_U482 "GRT155R60J475ME13J" CAPC1005X60N 1.879,83.143 r0 top (schematic designator C82)
C_U483 "GMT04X7S105K10NT10" CAPC1005X55N -1.261,85.705 r270 top (schematic designator C83)
C_U484 "VJ0402Y104KXXCW1BC" CAPC1005X55N 0.187,85.705 r270 top (schematic designator C84)
C_U485 "C0402C101J1GACAUTO" CAPC1005X55N 1.623,85.734 r270 top (schematic designator C85)
C_U582 "GRT155R60J475ME13J" CAPC1005X60N 13.008,82.946 r180 top (schematic designator C82)
C_U583 "GMT04X7S105K10NT10" CAPC1005X55N 8.925,85.581 r270 top (schematic designator C83)
C_U584 "VJ0402Y104KXXCW1BC" CAPC1005X55N 10.389,85.579 r270 top (schematic designator C84)
C_U585 "C0402C101J1GACAUTO" CAPC1005X55N 11.825,85.581 r270 top (schematic designator C85)
C_U682 "GRT155R60J475ME13J" CAPC1005X60N -4.463,30.796 r90 top (schematic designator C82)
C_U683 "GMT04X7S105K10NT10" CAPC1005X55N -5.827,38.2 r0 top (schematic designator C83)
C_U684 "VJ0402Y104KXXCW1BC" CAPC1005X55N -5.8,36.65 r0 top (schematic designator C84)
C_U685 "C0402C101J1GACAUTO" CAPC1005X55N -5.9,35.1 r0 top (schematic designator C85)
D10 "SZMMSZ5234BT1G" DIO_SZMMSZ5234BT1G 21.12,114.251 r180 top
D_U11 "BAT43WS-TP" SOD2512X115N 17.533,41.6 r180 top (schematic designator D1)
D_U12 "BAT43WS-TP" SOD2512X115N 17.535,44.3 r0 top (schematic designator D2)
D_U13 "BAT43WS-TP" SOD2512X115N 21.325,53.751 r90 top (schematic designator D3)
D_U14 "BAT43WS-TP" SOD2512X115N 18.655,53.9 r270 top (schematic designator D4)
D_U15 "BAT43WS-TP" SOD2512X115N 21.625,49.45 r270 top (schematic designator D5)
D_U16 "BAT43WS-TP" SOD2512X115N 18.925,49.425 r90 top (schematic designator D6)
D_U17 "BAT43WS-TP" SOD2512X115N 21.65,60.725 r270 top (schematic designator D7)
D_U18 "BAT43WS-TP" SOD2512X115N 18.982,60.695 r90 top (schematic designator D8)
D_U19 "WL-SMCW_0603" WL-SMCW_0603 -7.962,103.923 r0 top (schematic designator D9)
D_U21 "BAT43WS-TP" SOD2512X115N -16.835,53.408 r270 top (schematic designator D1)
D_U22 "BAT43WS-TP" SOD2512X115N -14.134,53.408 r90 top (schematic designator D2)
D_U23 "BAT43WS-TP" SOD2512X115N -6.3,41.625 r0 top (schematic designator D3)
D_U24 "BAT43WS-TP" SOD2512X115N -6.3,44.275 r180 top (schematic designator D4)
D_U25 "BAT43WS-TP" SOD2512X115N -16.795,49.09 r270 top (schematic designator D5)
D_U26 "BAT43WS-TP" SOD2512X115N -14.141,49.09 r90 top (schematic designator D6)
D_U27 "BAT43WS-TP" SOD2512X115N -13.113,43.866 r90 top (schematic designator D7)
D_U28 "BAT43WS-TP" SOD2512X115N -10.439,43.866 r270 top (schematic designator D8)
D_U29 "WL-SMCW_0603" WL-SMCW_0603 24.838,99.475 r0 top (schematic designator D9)
D_U31 "BAT43WS-TP" SOD2512X115N -1.531,41.625 r0 top (schematic designator D1)
D_U32 "BAT43WS-TP" SOD2512X115N -1.531,44.325 r180 top (schematic designator D2)
D_U33 "BAT43WS-TP" SOD2512X115N 12.625,41.7 r180 top (schematic designator D3)
D_U34 "BAT43WS-TP" SOD2512X115N 12.611,44.325 r0 top (schematic designator D4)
D_U35 "BAT43WS-TP" SOD2512X115N 3.3,41.625 r0 top (schematic designator D5)
D_U36 "BAT43WS-TP" SOD2512X115N 3.3,44.325 r180 top (schematic designator D6)
D_U37 "BAT43WS-TP" SOD2512X115N 8.216,41.7 r0 top (schematic designator D7)
D_U38 "BAT43WS-TP" SOD2512X115N 8.216,44.325 r180 top (schematic designator D8)
D_U39 "WL-SMCW_0603" WL-SMCW_0603 -18.2,99.3 r0 top (schematic designator D9)
D_U41 "BAT43WS-TP" SOD2512X115N -16.864,70.965 r270 top (schematic designator D1)
D_U42 "BAT43WS-TP" SOD2512X115N -14.21,70.965 r90 top (schematic designator D2)
D_U43 "BAT43WS-TP" SOD2512X115N -16.889,62.451 r270 top (schematic designator D3)
D_U44 "BAT43WS-TP" SOD2512X115N -14.22,62.451 r90 top (schematic designator D4)
D_U45 "BAT43WS-TP" SOD2512X115N -16.899,66.626 r270 top (schematic designator D5)
D_U46 "BAT43WS-TP" SOD2512X115N -14.25,66.626 r90 top (schematic designator D6)
D_U47 "BAT43WS-TP" SOD2512X115N -16.91,57.853 r270 top (schematic designator D7)
D_U48 "BAT43WS-TP" SOD2512X115N -14.21,57.853 r90 top (schematic designator D8)
D_U49 "WL-SMCW_0603" WL-SMCW_0603 3.625,103.95 r0 top (schematic designator D9)
D_U59 "WL-SMCW_0603" WL-SMCW_0603 14.895,103.839 r0 top (schematic designator D9)
D_U69 "WL-SMCW_0603" WL-SMCW_0603 -15.234,31.91 r270 top (schematic designator D9)
J1 "6130XX11121_61300511121" 61300511121 -45.463,49.845 r0 top
J2 "CBJ70" CONN_CBJ70_CIN -17.38,112.372 r180 top
J3 "6130XX11121_61300211121" 61300211121 24.975,65.3 r270 top
J4 "476-4" 4764 46.375,91.947 r0 top
J5 "476-4" 4764 11.643,114.299 r0 top
J6 "6130XX21821_61300821821" 61300821821 -34.876,59.697 r270 top
J7 "6130XX21821_61300821821" 61300821821 -34.876,48.1 r270 top
J8 "6130XX21821_61300821821" 61300821821 13.767,23.18 r180 top
J9 "6130XX21821_61300821821" 61300821821 2.132,23.18 r180 top
J10 "476-4" 4764 -54.353,100.6 r180 top
J11 "476-4" 4764 46.375,114.299 r0 top
J12 "476-4" 4764 46.375,63.08 r180 top
J13 "476-4" 4764 -30.56,38.145 r180 top
J14 "476-4" 4764 46.375,43.865 r0 top
J15 "476-4" 4764 -45.463,38.145 r0 top
J16 "PBC02DAAN" CONN4_DAAN_SUL -31.89,86.265 r0 top
J17 "476-4" 4764 46.375,24.941 r0 top
J18 "476-4" 4764 58.775,91.947 r180 top
J19 "476-4" 4764 -1.455,114.299 r0 top
J20 "476-4" 4764 -54.353,112.699 r180 top
J21 "476-4" 4764 58.775,114.299 r180 top
J22 "476-4" 4764 58.775,63.08 r0 top
J23 "476-4" 4764 -30.56,22.491 r0 top
J24 "67996-206HLF" 67996-206HLF_AMP -36.4,106.24 r90 top
J25 "476-4" 4764 58.775,43.865 r0 top
J28 "6130XX11121_61300211121" 61300211121 -48.575,72.05 r0 top
J29 "6130XX11121_61300211121" 61300211121 -39.55,84.955 r90 top
J30 "6130XX11121_61300211121" 61300211121 -26.78,62.799 r180 top
J31 "6130XX11121_61300211121" 61300211121 -0.529,34.709 r180 top
J32 "476-4" 4764 -45.463,22.968 r180 top
J33 "476-4" 4764 58.775,24.941 r0 top
J_U126 "6130XX11121_61300211121" 61300211121 -8.411,80.765 r0 top (schematic designator J26)
J_U127 "6130XX11121_61300211121" 61300211121 -7.236,90.682 r90 top (schematic designator J27)
J_U226 "6130XX11121_61300211121" 61300211121 16.9,77.075 r180 top (schematic designator J26)
J_U227 "6130XX11121_61300211121" 61300211121 24.4,89.3 r90 top (schematic designator J27)
J_U326 "6130XX11121_61300211121" 61300211121 -14.45,78.5 r0 top (schematic designator J26)
J_U327 "6130XX11121_61300211121" 61300211121 -18.75,88.992 r90 top (schematic designator J27)
J_U426 "6130XX11121_61300211121" 61300211121 -1.49,80.812 r180 top (schematic designator J26)
J_U427 "6130XX11121_61300211121" 61300211121 4.513,90.993 r90 top (schematic designator J27)
J_U526 "6130XX11121_61300211121" 61300211121 5.547,80.812 r180 top (schematic designator J26)
J_U527 "6130XX11121_61300211121" 61300211121 16.85,91.075 r90 top (schematic designator J27)
J_U626 "6130XX11121_61300211121" 61300211121 -0.529,31.315 r0 top (schematic designator J26)
J_U627 "6130XX11121_61300211121" 61300211121 -10.075,36.995 r90 top (schematic designator J27)
P1 "61300311121" 61300311121 26.507,71.7 r180 top
P2 "61300311121" 61300311121 13.761,80.749 r0 top
Q1 "SQ2319CES-T1_GE3" PMOSGSD_SOT-23_TO-236_VIS 26.15,115.6 r270 top
Q_U12 "2N7002" SOT-23TO-236_318-08_ONS -8,100.975 r90 top (schematic designator Q2)
Q_U22 "2N7002" SOT-23TO-236_318-08_ONS 24.609,96.602 r90 top (schematic designator Q2)
Q_U32 "2N7002" SOT-23TO-236_318-08_ONS -18.458,96.142 r90 top (schematic designator Q2)
Q_U42 "2N7002" SOT-23TO-236_318-08_ONS 3.25,100.95 r90 top (schematic designator Q2)
Q_U52 "2N7002" SOT-23TO-236_318-08_ONS 14.675,100.9 r90 top (schematic designator Q2)
Q_U62 "2N7002" SOT-23TO-236_318-08_ONS -12.209,29.97 r180 top (schematic designator Q2)
R1 "ERA6AEB304V" RES_ERA6AEB304V -31.745,99.587 r180 top
R2 "RT0805DRE0720RL" RC0805N_YAG -36.1,92.45 r180 top
R3 "RMCF0805JT33R0" STA_RMCF0805_STP -39.154,67.225 r270 top
R4 "RMCF0805JT33R0" STA_RMCF0805_STP -41.485,67.225 r270 top
R5 "RMCF0805JT33R0" STA_RMCF0805_STP -46.159,67.225 r270 top
R6 "RMCF0805JT33R0" STA_RMCF0805_STP -43.856,67.225 r270 top
R8 "ERA2AEB101X" RES_ERA2AEB101X 17.982,57.36 r90 top
R9 "CSRT0603FT5R00" RES_CSRT0603_STP 4.725,75.65 r180 top
R10 "ERA2AEB101X" RES_ERA2AEB101X 11.875,75.575 r180 top
R11 "ERA2AEB101X" RES_ERA2AEB101X 17.982,69.5 r90 top
R12 "ERA2AEB101X" RES_ERA2AEB101X 17.998,66.68 r90 top
R13 "ERA2AEB101X" RES_ERA2AEB101X -11.025,71.575 r0 top
R14 "ERA2AEB101X" RES_ERA2AEB101X 17.96,64.146 r90 top
R15 "ERA2AEB101X" RES_ERA2AEB101X 18.622,72.46 r270 top
R16 "ERA2AEB101X" RES_ERA2AEB101X -5.262,75.55 r180 top
R17 "CSRT0603FT5R00" RES_CSRT0603_STP -8.3,75.5 r0 top
R18 "ERA2AEB101X" RES_ERA2AEB101X 1.338,75.625 r180 top
R19 "ERA2AEB101X" RES_ERA2AEB101X 8.55,75.5 r180 top
R20 "ERA2AEB101X" RES_ERA2AEB101X -1.962,75.55 r0 top
R21 "ERA2AED103X" RES_ERA2A_PAN -25.875,58.2 r270 top
R22 "ERA2AED103X" RES_ERA2A_PAN 5.367,32.842 r0 top
R23 "ERA2AED103X" RES_ERA2A_PAN -24.24,58.195 r270 top
R24 "ERA2AED103X" RES_ERA2A_PAN 5.235,35.047 r0 top
R25 "ERA2AED103X" RES_ERA2A_PAN -30.091,49.174 r270 top
R26 "ERA2AED103X" RES_ERA2A_PAN 14.425,28.3 r0 top
R33 "ERA6AEB104V" RES_ERA6AEB104V 20.755,116.545 r0 top
R34 "ERA-3AEB201V" RES_ERA3AEB201V 40.2,26.78 r90 top
R35 "ERA-3AEB201V" RES_ERA3AEB201V 44.9,85.15 r180 top
R36 "ERA-3AEB201V" RES_ERA3AEB201V -51.671,92.45 r0 top
R37 "ERA-3AEB201V" RES_ERA3AEB201V 40.225,64.755 r90 top
R38 "ERA-3AEB201V" RES_ERA3AEB201V 40.225,45.075 r90 top
R39 "ERA-3AEB201V" RES_ERA3AEB201V -51.625,39.975 r90 top
R40 "ERA-3AEB201V" RES_ERA3AEB201V 21.281,110.38 r180 top
R41 "ERA-3AEB201V" RES_ERA3AEB201V 40.229,115.626 r90 top
R42 "ERA-3AEB201V" RES_ERA3AEB201V -25.225,40.175 r90 top
R_U17 "ERA6AEB203V" RES_ERA6AEB203V -14.925,85.7 r90 top (schematic designator R7)
R_U27 "ERA6AEB203V" RES_ERA6AEB203V 36.25,89.925 r90 top (schematic designator R7)
R_U37 "ERA6AEB203V" RES_ERA6AEB203V -23.75,82.5 r0 top (schematic designator R7)
R_U47 "ERA6AEB203V" RES_ERA6AEB203V -2.955,85.699 r90 top (schematic designator R7)
R_U57 "ERA6AEB203V" RES_ERA6AEB203V 8.725,90 r90 top (schematic designator R7)
R_U67 "ERA6AEB203V" RES_ERA6AEB203V -10.875,20.2 r90 top (schematic designator R7)
R_U127 "RNCF0402DTE1K50" RESC1005X35N 16.002,47.885 r180 top (schematic designator R27)
R_U128 "RNCF0402DTE1K50" RESC1005X35N 15.225,55.357 r90 top (schematic designator R28)
R_U129 "RNCF0402DTE1K50" RESC1005X35N 15.23,51.866 r90 top (schematic designator R29)
R_U130 "RNCF0402DTE1K50" RESC1005X35N 15.02,61.408 r90 top (schematic designator R30)
R_U131 "ERA6AEB304V" RES_ERA6AEB304V -6.816,94.61 r0 top (schematic designator R31)
R_U132 "RT0805BRD07270RL" RESC2012X60N -11.2,101.83 r90 top (schematic designator R32)
R_U143 "3296Y-1-104LF" TRIM_3296Y-1-104LF -12.345,92.815 r90 top (schematic designator R43)
R_U227 "RNCF0402DTE1K50" RESC1005X35N -10.015,52.963 r90 top (schematic designator R27)
R_U228 "RNCF0402DTE1K50" RESC1005X35N -4.362,47.77 r0 top (schematic designator R28)
R_U229 "RNCF0402DTE1K50" RESC1005X35N -10.015,49.591 r90 top (schematic designator R29)
R_U230 "RNCF0402DTE1K50" RESC1005X35N -7.907,47.796 r0 top (schematic designator R30)
R_U231 "ERA6AEB304V" RES_ERA6AEB304V 23.7,93.4 r180 top (schematic designator R31)
R_U232 "RT0805BRD07270RL" RESC2012X60N 21.35,97.55 r90 top (schematic designator R32)
R_U243 "3296Y-1-104LF" TRIM_3296Y-1-104LF 32.43,86.885 r90 top (schematic designator R43)
R_U327 "RNCF0402DTE1K50" RESC1005X35N -0.746,47.735 r0 top (schematic designator R27)
R_U328 "RNCF0402DTE1K50" RESC1005X35N 11.05,47.796 r180 top (schematic designator R28)
R_U329 "RNCF0402DTE1K50" RESC1005X35N 3.926,47.766 r180 top (schematic designator R29)
R_U330 "RNCF0402DTE1K50" RESC1005X35N 8.218,47.796 r180 top (schematic designator R30)
R_U331 "ERA6AEB304V" RES_ERA6AEB304V -18.555,92.862 r0 top (schematic designator R31)
R_U332 "RT0805BRD07270RL" RESC2012X60N -21.778,97 r90 top (schematic designator R32)
R_U343 "3296Y-1-104LF" TRIM_3296Y-1-104LF -24.325,88.675 r90 top (schematic designator R43)
R_U427 "RNCF0402DTE1K50" RESC1005X35N -10.049,66.591 r270 top (schematic designator R27)
R_U428 "RNCF0402DTE1K50" RESC1005X35N -9.933,60.676 r270 top (schematic designator R28)
R_U429 "RNCF0402DTE1K50" RESC1005X35N -10.059,63.775 r270 top (schematic designator R29)
R_U430 "RNCF0402DTE1K50" RESC1005X35N -10.075,57.05 r90 top (schematic designator R30)
R_U431 "ERA6AEB304V" RES_ERA6AEB304V 5.375,95.15 r0 top (schematic designator R31)
R_U432 "RT0805BRD07270RL" RESC2012X60N -0.075,101.88 r90 top (schematic designator R32)
R_U443 "3296Y-1-104LF" TRIM_3296Y-1-104LF 0.1,92.825 r90 top (schematic designator R43)
R_U531 "ERA6AEB304V" RES_ERA6AEB304V 17.325,95.15 r0 top (schematic designator R31)
R_U532 "RT0805BRD07270RL" RESC2012X60N 11.225,101.825 r90 top (schematic designator R32)
R_U543 "3296Y-1-104LF" TRIM_3296Y-1-104LF 12.5,92.875 r90 top (schematic designator R43)
R_U631 "ERA6AEB304V" RES_ERA6AEB304V -12.209,26.675 r0 top (schematic designator R31)
R_U632 "RT0805BRD07270RL" RESC2012X60N -15.963,28.929 r180 top (schematic designator R32)
R_U643 "3296Y-1-104LF" TRIM_3296Y-1-104LF -7.125,23.2 r90 top (schematic designator R43)
U1 "OPA320AIDBVT" DBV5 -32.077,96.219 r90 top
U2 "SN74AXC8T245PWR" SOP65P640X120-24N -25.256,52.82 r0 top
U3 "SN74AXC8T245PWR" SOP65P640X120-24N 10.766,34.41 r90 top
U4 "03458 401 X215" "03458 401 X215" 2.575,60.3 r0 top
U_U12 "LD39050PUR" SON95P300X300X100-7N -7.135,85.602 r180 top (schematic designator U2)
U_U22 "LD39050PUR" SON95P300X300X100-7N 26.263,83.543 r0 top (schematic designator U2)
U_U32 "LD39050PUR" SON95P300X300X100-7N -19.37,82.985 r180 top (schematic designator U2)
U_U42 "LD39050PUR" SON95P300X300X100-7N 5.119,85.351 r180 top (schematic designator U2)
U_U52 "LD39050PUR" SON95P300X300X100-7N 15.607,85.347 r180 top (schematic designator U2)
U_U62 "LD39050PUR" SON95P300X300X100-7N -7.244,32.21 r0 top (schematic designator U2)

## Footprints (in the part's own frame and the unit in brackets; to place one, negate y for a bottom-side part, rotate by r counter-clockwise, add the part's x,y. Pads: shape width x height; smd on the part's side, far side on the other; paste and mask are expansions set on the pad)
"03458 401 X215" [mil]
  round 53.15 hole 35: 1(-22,368) 2(-62,268) 3(-102,368) 4(-142,268) 5(-182,368) 6(-270,180) 7(-370,140) 8(-270,100) 9(-370,60) 10(-270,20) 11(-370,-20) 12(-270,-60) 13(-370,-100) 14(-270,-140) 15(-370,-180) 16(-182,-268) 17(-142,-368) 18(-102,-268) 19(-62,-368) 20(-22,-268) 21(18,-368) 22(58,-268) 23(98,-368) 24(138,-268) 25(178,-368) 26(266,-180) 27(366,-140) 28(266,-100) 29(366,-60) 30(266,-20) 31(366,20) 32(266,60) 33(366,100) 34(266,140) 35(366,180) 36(178,268) 37(138,368) 38(98,268) 39(58,368) 40(18,268)
4764 [mm]
  round 5 hole 3.63: 1(0,0)
  silkscreen extent -2.77,-2.77 2.77,2.77, body extent -2.76,-2.77 2.76,2.77, height 1.96
67996-206HLF_AMP [mil]
  rect 60x60 / inner round 60 / far side rect 60x60 hole 38 paste-99999 mask+0: 1(0,0)
  round 60 hole 40 paste-99999 mask+0: 2(0,100) 3(-100,0) 4(-100,100) 5(-200,0) 6(-200,100)
  silkscreen extent -255,-85 55,150, body extent -250,-50 50,150, height 350
61300211121 [mm] "Pin Header, pitch 2.54 mm, THT, Vertical, single row, 2p"
  rrect50% 1.6x1.6 hole 1.1: 1(-1.27,0)
  round 1.6 hole 1.1: 2(1.27,0)
  silkscreen extent -3.26,-1.35 2.69,1.35, body extent -2.54,-1.27 2.54,1.27, height 8.57
61300311121 [mm] "Pin Header, pitch 2.54 mm, THT, Vertical, single row, 3p"
  rrect50% 1.6x1.6 hole 1.1: 1(-2.54,0)
  round 1.6 hole 1.1: 2(0,0) 3(2.54,0)
  silkscreen extent -4.53,-1.35 3.96,1.35, body extent -3.81,-1.27 3.81,1.27, height 8.57
61300511121 [mm] "Pin Header, pitch 2.54 mm, THT, Vertical, single row, 5p"
  rrect50% 1.6x1.6 hole 1.1: 1(-5.08,0)
  round 1.6 hole 1.1: 2(-2.54,0) 3(0,0) 4(2.54,0) 5(5.08,0)
  silkscreen extent -7.07,-1.35 6.5,1.35, body extent -6.35,-1.27 6.35,1.27, height 8.57
61300821821 [mm] "Socket Header, Pitch 2.54 mm, THT, Vertical, dual row, 8p"
  rrect50% 1.5x1.5 hole 1.02: 1(-3.81,-1.27)
  round 1.5 hole 1.02: 2(-3.81,1.27) 3(-1.27,-1.27) 4(-1.27,1.27) 5(1.27,-1.27) 6(1.27,1.27) 7(3.81,-1.27) 8(3.81,1.27)
  silkscreen extent -5.46,-3.22 5.46,2.62, body extent -5.33,-2.54 5.33,2.54, height 8.45
CAP_CC0805_YAG [mil]
  rect 44x57 smd paste+0 mask+0: 1(-35.31,0) 2(35.31,0)
  body extent -43,-29 43,29, height 57
CAPC1005X55N [mm]
  rect 0.55x0.6 smd paste+0 mask+0.102: 1(-0.427,0) 2(0.427,0)
  body extent -0.5,-0.25 0.5,0.25, height 0.55
CAPC1005X60N [mm]
  rect 0.56x0.63 smd: 1(-0.435,0) 2(0.435,0)
  body extent -0.5,-0.25 0.5,0.25, height 0.6
CAPC2012X135N [mm]
  rect 0.96x1.39 smd: 1(-0.81,0) 2(0.81,0)
  body extent -1,-0.63 1,0.63, height 1.35
CAPC2012X145N [mm]
  rect 0.99x1.47 smd: 1(-0.82,0) 2(0.82,0)
  body extent -0.98,-0.72 1.02,0.72, height 1.26
CAPC2112X94N [mm]
  rect 0.99x1.47 smd: 1(-0.87,0) 2(0.87,0)
  silkscreen extent 0,-0.53 0,0.53, body extent -1.05,-0.63 1.05,0.63, height 0.94
CONN4_DAAN_SUL [mil]
  round 45 hole 35 paste-99999 mask+0: 1(0,0) 2(0,-100) 3(100,0) 4(100,-100)
  silkscreen extent -95,-155 155,55, body extent -50,-150 150,50, height 324
CONN_CBJ70_CIN [mil]
  round 83 / inner round 82.99 / far side round 83 hole 63 paste-99999 mask+0: 1(0,0) 2(0,-100)
  round 90 hole 70 paste-99999 mask-45: 3(-150,150) 4(150,150) 5(-150,-150) 6(150,-150)
  silkscreen extent -340,-255 255,255, body extent -250,-250 250,250, height 831
DBV5 [mil]
  rect 58x22 smd paste-29 mask-29: 1(-47,37.4) 2(-47,0) 3(-47,-37.4) 4(47,-37.4) 5(47,37.4)
  silkscreen extent -12,-60 34,60, body extent -59,-60 59,60, height 57
DIO_SZMMSZ5234BT1G [mm]
  rect 0.91x1.22 smd paste+0 mask+0.102: 1(-1.635,0) 2(1.635,0)
  silkscreen extent -2.7,-0.8 0.86,0.8, body extent -1.84,-0.8 1.84,0.8, height 1.35
PMOSGSD_SOT-23_TO-236_VIS [mil]
  rect 22x52 smd paste+0 mask+0: 1(-37.4,-40) 2(37.4,-40) 3(0,40)
  silkscreen extent -115,-57 65,33, body extent -60,-52 60,52, height 44
RC0805N_YAG [mil]
  rect 40x48 smd paste+0 mask+0: 1(-33.5,0) 2(33.5,0)
  Top Layer keep-out region: -11.5,-22 -11.5,22 11.5,22 11.5,-22
  Keep-Out Layer region: -11.5,-24 -11.5,24 11.5,24 11.5,-24
  body extent -39,-24 39,24, height 28
RES_CSRT0603_STP [mil]
  rect 32x35 smd paste+0 mask+0: 1(-31.5,0) 2(31.5,0)
  Top Layer keep-out region: -13.5,-15.5 -13.5,15.5 13.5,15.5 13.5,-15.5
  Keep-Out Layer region: -13.5,-17.5 -13.5,17.5 13.5,17.5 13.5,-17.5
  silkscreen extent -84,-3 -78,3, body extent -34,-17 34,17, height 22
RES_ERA2A_PAN [mil]
  rect 22x24 smd paste+0 mask+0: 1(-18.5,0) 2(18.5,0)
  body extent -21,-12 21,12, height 16
RES_ERA2AEB101X [mm]
  rect 0.475x0.5 smd: 1(-0.512,0) 2(0.512,0)
  body extent -0.5,-0.25 0.5,0.25, height 0.35
RES_ERA3AEB201V [mm]
  rect 0.65x0.9 smd: 1(-0.725,0) 2(0.725,0)
  silkscreen extent -0.08,-0.4 0.08,0.4, body extent -0.8,-0.4 0.8,0.4, height 0.45
RES_ERA6AEB104V [mm]
  rect 1.15x1.15 smd: 1(-1.175,0) 2(1.175,0)
  silkscreen extent -0.28,-0.63 0.28,0.63, body extent -1,-0.63 1,0.63, height 0.6
RES_ERA6AEB203V [mm]
  rect 1.15x1.15 smd: 1(-1.175,0) 2(1.175,0)
  silkscreen extent -0.28,-0.63 0.28,0.63, body extent -1,-0.63 1,0.63, height 0.6
RES_ERA6AEB304V [mm]
  rect 1.15x1.15 smd: 1(-1.175,0) 2(1.175,0)
  silkscreen extent -0.28,-0.63 0.28,0.63, body extent -1,-0.63 1,0.63, height 0.6
RESC1005X35N [mm]
  rect 0.49x0.6 smd: 1(-0.457,0) 2(0.457,0)
  body extent -0.5,-0.25 0.5,0.25, height 0.35
RESC2012X60N [mm]
  rect 0.92x1.38 smd: 1(-0.955,0) 2(0.955,0)
  silkscreen extent -0.17,-0.68 0.17,0.68, body extent -1,-0.63 1,0.63, height 0.6
SOD2512X115N [mm]
  rect 1.1x0.5 smd: 1(-1.15,0) 2(1.15,0)
  silkscreen extent -1.7,-0.63 0.85,0.63, body extent -1.25,-0.64 1.25,0.62, height 1.03
SON95P300X300X100-7N [mm]
  rrect50% 0.84x0.4 smd: 1(-1.435,0.95) 2(-1.435,0) 3(-1.435,-0.95) 4(1.435,-0.95) 5(1.435,0) 6(1.435,0.95)
  rect 1.625x2.365 smd paste-2: 7(0,0)
  silkscreen extent -2.62,-1.5 1.5,1.5, body extent -1.55,-1.55 1.55,1.55, height 0.99
SOP50P490X110-10N [mm]
  rect 1.4x0.3 smd: 1(-2.2,1) 2(-2.2,0.5) 3(-2.2,0) 4(-2.2,-0.5) 5(-2.2,-1) 6(2.2,-1) 7(2.2,-0.5) 8(2.2,0) 9(2.2,0.5) 10(2.2,1)
  silkscreen extent -2.9,-1.5 1.15,1.5, body extent -2.46,-1.5 2.46,1.5, height 1.07
SOP65P640X120-14N [mm]
  rect 1.475x0.45 smd: 1(-2.938,1.95) 2(-2.938,1.3) 3(-2.938,0.65) 4(-2.938,0) 5(-2.938,-0.65) 6(-2.938,-1.3) 7(-2.938,-1.95) 8(2.938,-1.95) 9(2.938,-1.3) 10(2.938,-0.65) 11(2.938,0) 12(2.938,0.65) 13(2.938,1.3) 14(2.938,1.95)
  silkscreen extent -3.67,-2.5 1.85,2.52, body extent -3.2,-2.5 3.2,2.5, height 1.13
SOP65P640X120-24N [mm]
  rrect25% 1.57x0.41 smd: 1(-2.87,3.575) 2(-2.87,2.925) 3(-2.87,2.275) 4(-2.87,1.625) 5(-2.87,0.975) 6(-2.87,0.325) 7(-2.87,-0.325) 8(-2.87,-0.975) 9(-2.87,-1.625) 10(-2.87,-2.275) 11(-2.87,-2.925) 12(-2.87,-3.575) 13(2.87,-3.575) 14(2.87,-2.925) 15(2.87,-2.275) 16(2.87,-1.625) 17(2.87,-0.975) 18(2.87,-0.325) 19(2.87,0.325) 20(2.87,0.975) 21(2.87,1.625) 22(2.87,2.275) 23(2.87,2.925) 24(2.87,3.575)
  silkscreen extent -4.54,-4.1 2.2,4.1, body extent -3.2,-3.9 3.2,3.9, height 1.2
SOT-23TO-236_318-08_ONS [mil]
  rect 22x50 smd paste+0 mask+0: 1(-37.5,-41) 2(37.5,-41) 3(0,41)
  silkscreen extent -115,-57 65,33, body extent -60,-52 60,52, height 44
STA_RMCF0805_STP [mil]
  rect 32x53 smd paste+0 mask+0: 1(-35.5,0) 2(35.5,0)
  body extent -44,-26 44,26, height 26
TRIM_3296Y-1-104LF [mm]
  rect 1.14x1.14 / inner round 1.14 / far side rect 1.14x1.14 hole 0.74: 1(-2.54,-1.27)
  round 1.14 hole 0.74: 2(0,1.27) 3(2.54,-1.27)
  silkscreen extent -5.35,-2.41 4.76,2.42, body extent -4.7,-2.41 4.83,2.41, height 11.55
WCAP-ASLI_6.3X5.5(DXL) [mm]
  rect 3.5x1.6 smd: 1(2.8,0) 2(-2.8,0)
  silkscreen extent -3.4,-3.4 3.4,3.4, body extent -3.3,-3.65 3.3,3.65, height 5.35
WL-SMCW_0603 [mm]
  rect 0.8x0.8 smd: 1(-0.8,0) 2(0.8,0)
  silkscreen extent -0.13,-0.5 0.11,0.5, body extent -0.8,-0.4 0.8,0.4, height 0.7